# Altium PCB Control Board-v1.0.PcbDoc (part 6 of 8)
Units mil, origin at the board's own origin, x right, y up, seen from the top; angles counter-clockwise.
Board outline 7874.02 x 5118.11 mil, 4 copper layers (Top Layer, Layer 1, Layer 2, Bottom Layer), stack 61.654 mil thick; 475 components, 366 nets, 1579 pads, 587 vias.
Unrouted connection lines stored in the file: 427.
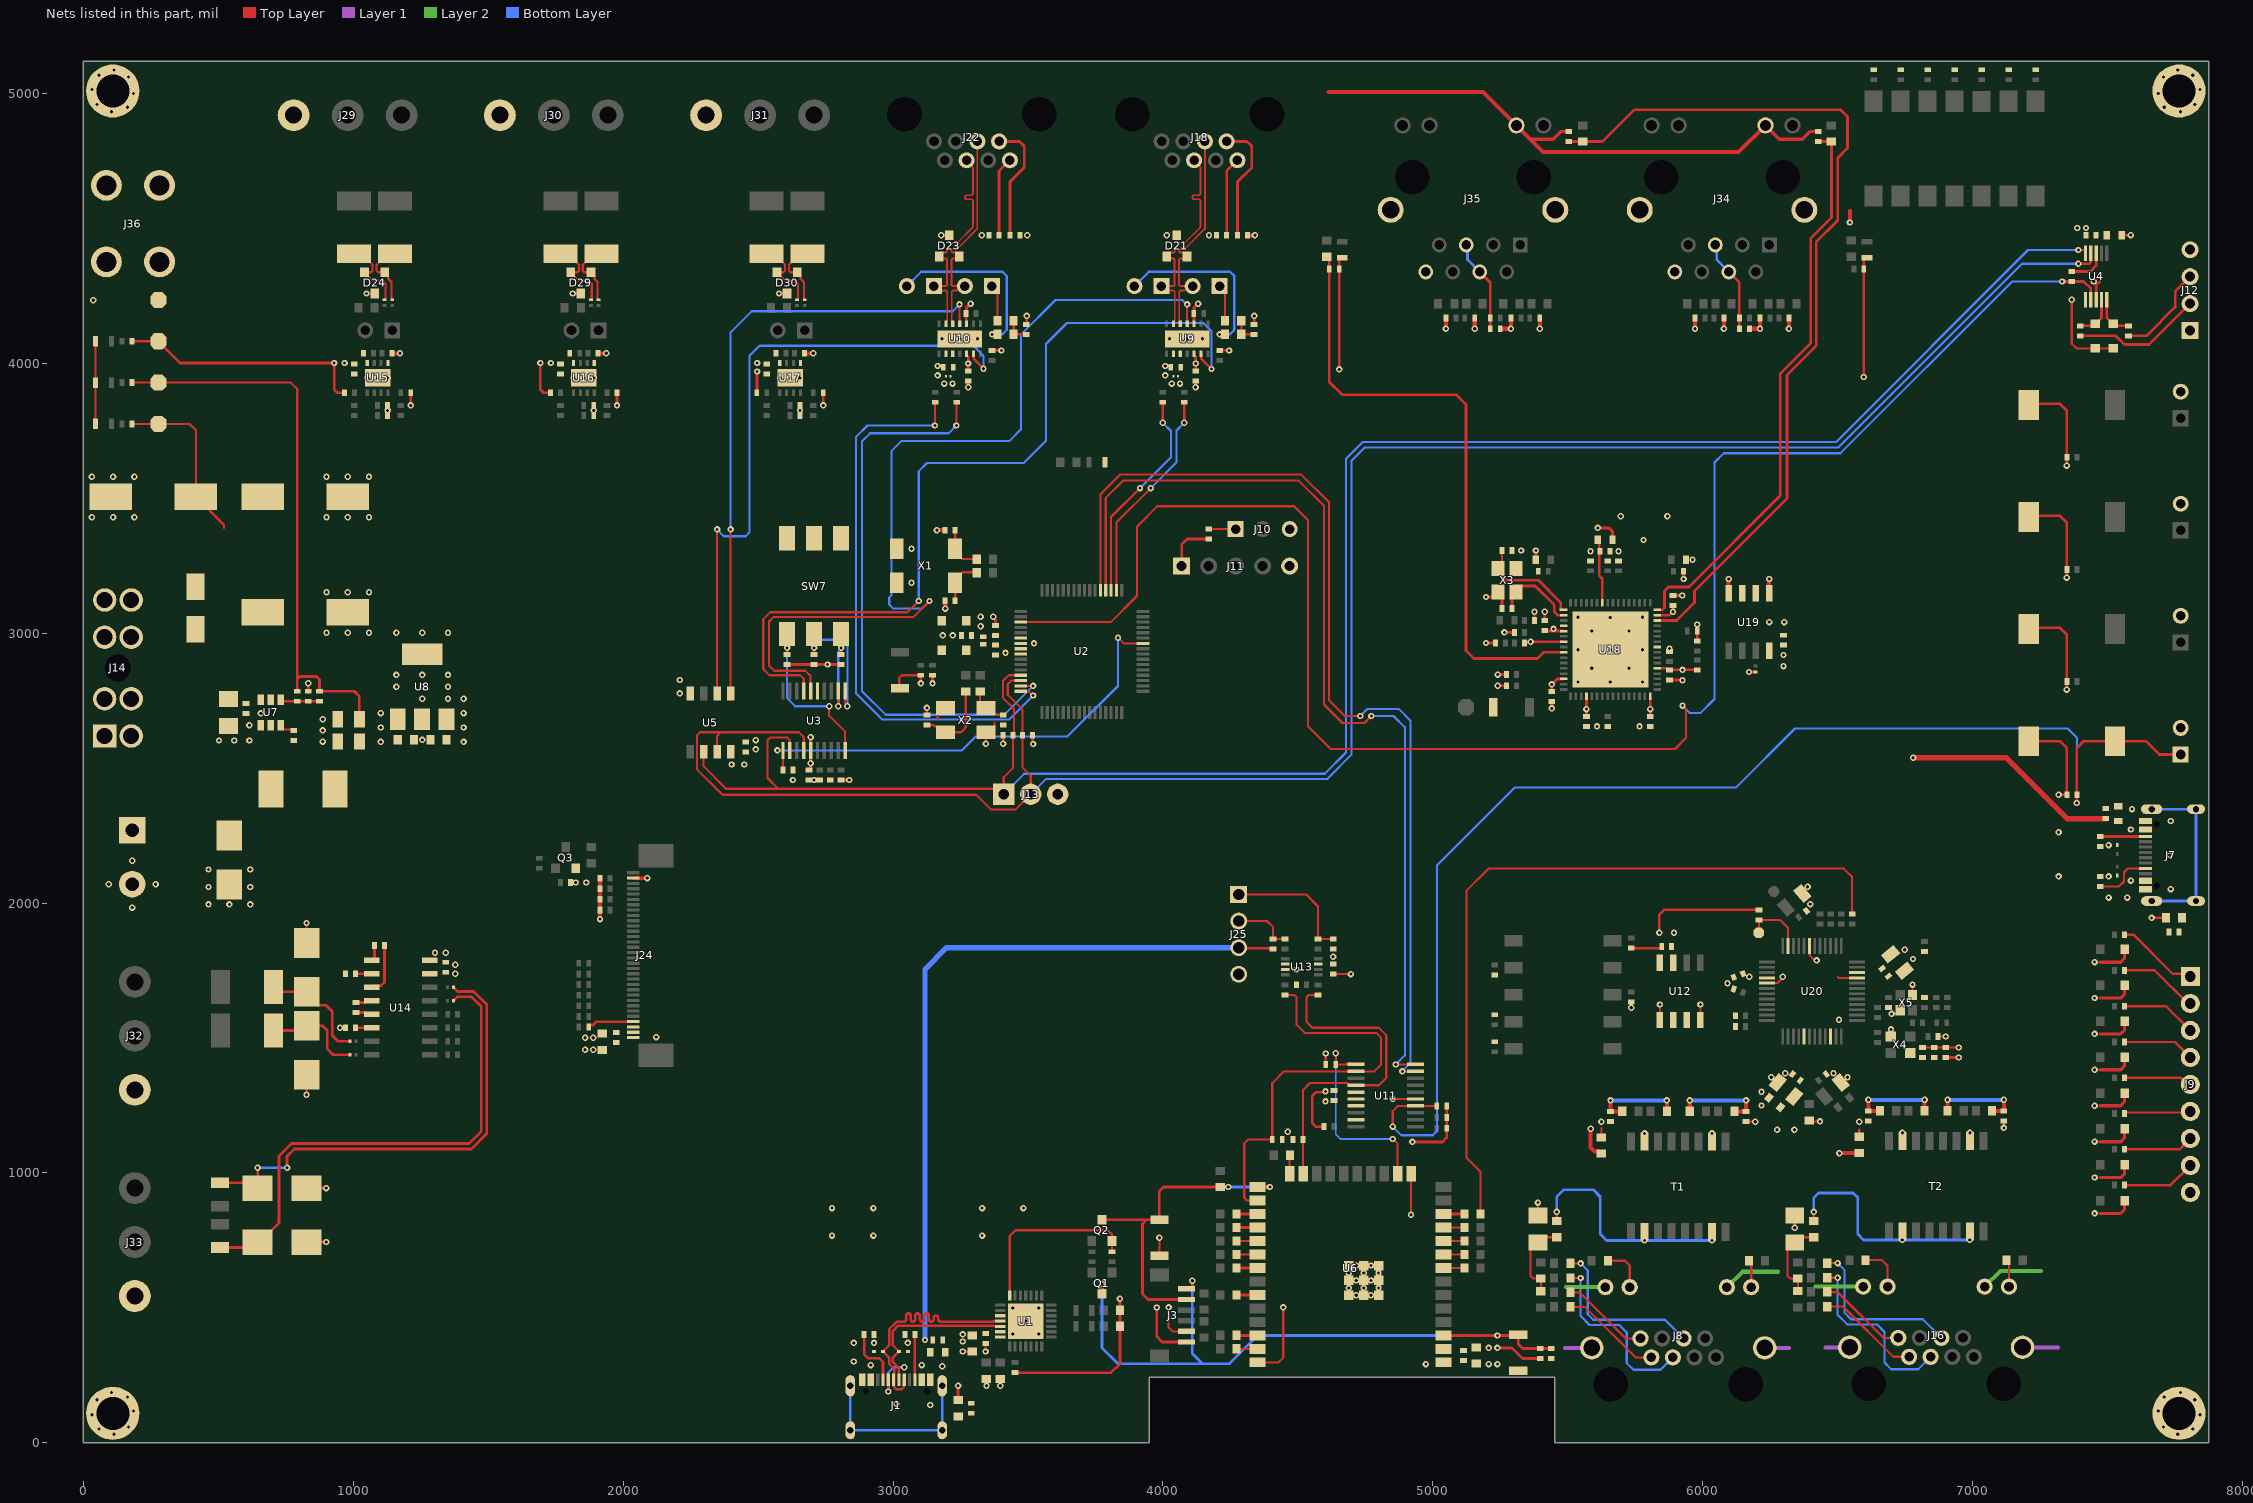
[diagram p5: the nets of this part, all layers, seen from the top]

## Via types
v1: diameter 23.62, hole 11.81, Top Layer to Bottom Layer, 587 vias

## Nets (pads, with @x,y where several pads share a name; then routed paths per layer and width w, separated by ;. In a path a pad name is that pad's centre, name@x,y a point inside that pad or via, vN(x,y) a via of type N, cw(c..) or ccw(c..) an arc to the next point about the centre after c; other vN are vias at no path point) (continued)
+3V3: C2.1 C3.2 C9.2 C10.2 C14.2 C16.2 C22.2 C26.2 C34.2 C37.2 C39.2 C40.2 C41.2 C43.2 C47.2 C48.2 C52.2 C53.2 C54.2 C55.2 C56.2 C57.2 C67.2 C68.1 C80.2 C81.2 C82.2 C96.2 C99.2 C100.2 C101.2 C104.2 D5.1 FB4.1 FB5.2 FB6.1 FB7.1 FB9.1 J3.1 J8.9 J8.11 J11.1 J12.1 J16.9 J16.11 J24.2 J24.3 J24.31 L1.1 LED4.1 LED5.1 R4.2 R5.2 R6.2 R7.2 R8.1 R10.2 R11.2 R20.2 R21.2 R22.2 R25.2 R33.2 R39.2 R40.2 R41.2 R46.1 R73.2 R75.2 R91.2 R92.2 R93.1 R94.1 R95.1 R103.2 R104.2 R105.2 R106.2 R116.1 R122.2 R123.2 R124.2 R125.2 R126.2 R127.2 R128.2 R129.2 R140.1 R141.1 R144.1 R157.1 R158.1 R161.2 R162.2 R165.2 R166.2 R173.2 R176.1 R190.2 R215.2 R216.2 TP3.1 U1.6 U1.7 U2.6 U2.8 U3.5 U5.8 U6.2 U8.3 U9.5 U10.5 U11.5 U12.8 U13.3 U14.16 U15.8 U16.8 U17.8 U18.5 U18.7 U18.14 U18.20 U18.32 U18.37 U18.47 U19.8 U20.22 U20.40 X4.4 | length 7220.8
  Top Layer w10: R46.1@180.31,4081.02 TP3.1@278.31,4081.02 358.68,4000.65 v1(929.32,4000.65) 929.32,3902.91 941.82,3890.41 R103.2@967.2,3890.41 ; R105.2@1127.32,3806.57 v1(1127.32,3825.11) R104.2@1127.32,3843.65 ; v1(1213.32,3843.65) R106.2@1213.32,3890.41 ; v1(1693.32,4000.65) 1693.32,3902.91 1705.82,3890.41 R122.2@1731.2,3890.41 ; R124.2@1891.32,3806.57 v1(1891.32,3825.11) R123.2@1891.32,3843.65 ; v1(1977.32,3843.65) R125.2@1977.32,3890.41 ; v1@2495.7,3968.61 v1(2496.2,3969.11) R126.2@2496.2,3891.41 ; R41.2@2607.41,2883.95 R40.2@2707.41,2883.95 R39.2@2807.41,2883.95 ; R128.2@2655.32,3806.57 v1(2655.32,3825.11) R127.2@2655.32,3843.65 ; v1(2741.32,3843.65) R129.2@2741.32,3890.41 ; v1(3145.96,2813.84) R20.2@3145.96,2843.84 ; U10.5@3272.32,4035.41 3272.32,4029.5 3278.01,4023.81 v1(3278.01,3998.74) 3277.96,3998.68 3277.96,3971.2 C37.2@3277.91,3971.15 ; v1(3407.84,2590.02) 3407.84,2615.43 R21.2@3410.9,2618.49 ; R8.1@3452.12,260.37 3807.88,260.37 3840.49,292.98 R75.2@3840.49,431.69 R73.2@3840.49,490.74 v1(3840.49,534.19) ; R22.2@3517.09,2621.56 3517.99,2620.65 3517.99,2590.24 v1(3518.9,2589.33) ; v1(3977,501.85) 3977,393.56 3996.67,373.9 J3.1@4086.23,373.9 ; J11.1@4069.27,3248.42 4069.27,3327.74 4089.96,3348.42 R25.2@4169.27,3348.42 ; U9.5@4115.39,4035.41 4115.39,4029.5 4121.09,4023.81 v1(4121.09,3998.74) 4121.04,3998.68 4121.04,3971.2 C34.2@4120.98,3971.15 ; R5.2@4597,1171.74 4565.47,1171.74 4553.1,1184.1 4553.1,1286.19 4565.8,1298.89 4598.84,1298.89 v1(4602.04,1302.08) ; R176.1@4603,1402 v1(4603,1442.7) ; v1(4653,3977.11) 4652.82,3977.29 R166.2@4652.82,4348.65 4652.82,4385.8 4657.66,4390.65 LED5.1@4664.63,4390.65 ; v1(4924,1115) 5035.23,1115 5051,1130.77 R6.2@5051,1165.44 R7.2@5051,1205.77 R173.2@5051,1248.51 ; v1@5239,346.18 v1(5239,351.9) 5292.67,351.9 5332.1,312.47 R4.2@5397.23,312.47 ; v1(5240.01,2846.33) R144.1@5272.3,2846.33 ; R158.1@5339.3,2963.21 5341.61,2965.52 5359.49,2965.52 v1(5361.8,2967.83) ; v1@5362.1,2968.13 U18.7@5484.05,2968.13 ; C54.2@5414.3,3009.87 5416.59,3007.58 U18.5@5483.97,3007.58 ; C57.2@5440.47,2783.33 v1(5440.47,2810.13) 5460.67,2830.33 U18.14@5484.05,2830.33 ; v1@5446.53,3007.58 U18.5@5483.97,3007.58 ; U18.5@5484.05,3007.5 U18.5@5483.97,3007.58 ; C52.2@5568.91,2691.69 U18.20@5568.91,2765.59 ; v1(5735,1612) R216.2@5735,1633 ; R215.2@5735,1833 5843.54,1833 5847.54,1837 C104.2@5847.54,1839 ; C53.2@5805.13,2691.69 U18.32@5805.13,2765.59 ; U18.37@5830.5,2869.7 5866.8,2869.7 5872.8,2863.7 C56.2@5876.3,2863.7 5876.43,2863.83 5979.17,2863.83 R161.2@5979.3,2863.97 ; U18.47@5830.5,3066.55 5876.51,3066.55 5889.31,3079.35 v1(5889.66,3079.35) 5889.73,3079.42 5889.73,3102.26 C55.2@5889.8,3102.33 ; v1(5839,1890) 5839,1957.01 5856.7,1974.71 R190.2@6207.65,1974.71 ; R162.2@5979.3,2970.5 R157.1@5979.3,3007.5 v1(5979.3,3032.1) ; v1(6596.33,3948.98) R165.2@6596.33,4348.86 6596.33,4385.8 6601.17,4390.65 LED4.1@6608.15,4390.65 ; C101.2@6900.24,1428 v1(6948,1428) ; FB5.2@7551.59,4474.4 v1(7585.6,4474.4)
  Top Layer w12: J24.31@2037.47,2092.24 v1(2089.01,2092.24) ; R126.2@2495.2,3890.41 R126.2@2496.2,3891.41 ; C14.2@2688.56,2492.68 2691.56,2492.68 2694.56,2495.68 v1(2694.56,2517.9) U3.5@2694.56,2564.7 v1@2694.56,2620.11 ; FB7.1@5381.44,3271.75 v1(5381.47,3306.22) ; v1(5610.37,3389.83) 5650.9,3389.83 5665.49,3375.24 FB9.1@5665.49,3346.83
  Top Layer w15: R116.1@1143.36,4036.74 v1(1173.13,4036.74) ; R140.1@1907.36,4036.74 v1(1937.13,4036.74) ; v1(1914.47,1940.66) R93.1@1914.47,2013.87 R94.1@1914.47,2052.87 R95.1@1914.47,2091.87 ; R141.1@2671.36,4036.74 v1@2701.13,4036.74
  Layer 2 w15: 5493.8,576.8 J8.9@5639,576.8 ; J8.11@6089,576.8 6146.2,634 6278,634 ; 6416.84,578.84 J16.9@6594.08,578.84 ; J16.11@7044.08,578.84 7102.24,637 7252,637
  other v1: 5207,351.9 3258.34,375.58 3258.34,401.89 4461.9,1153.07 6217.14,1250 6217.14,1300.82 1859,1501.11 1888.97,1500.89 6171.68,1726.99 4494.5,1753.94 1303,1816.11 1343,1816.11 6747.75,1826.65 2629.05,2455.68 2402,2513.11 2449,2513.11 1409,2597.11 2694.56,2614.11 1409,2650.44 1409,2703.78 5568.69,2718.34 5804.91,2718.34 1351,2757.11 1409,2757.11 5924.8,2863.83 6298.8,2877.83 2757.41,2883.95 6298.8,2918.83 3522.27,2961.95 5446.53,3015.56 3324.27,3025.68 3324.27,3060.37 5961.49,3271.72 968.2,4000.65 1732.2,4000.65 2496.2,4000.65 2704.32,4036.74
+3V3-A: C76.2 C78.2 C79.2 C97.2 FB4.2 T1.2 T1.7 T2.2 T2.7 U20.5 | length 192
  Top Layer w15: v1(5584.52,1163.94) 5584.52,1094.54 5599.56,1079.5 5616.61,1079.5 C76.2@5624.11,1072 ; v1(6506,1073) 6506.52,1073.52 6578.75,1073.52 C97.2@6579.27,1074.04
  other v1: 5784.08,1146.7 6034.08,1146.7 6739.16,1148.74 6989.16,1148.74 6275,1160 6339,1160
+5V: C18.2 C25.2 C27.2 C31.2 C32.2 C33.1 C36.1 D20.1 D22.1 J25.3 L2.2 R9.2 R12.2 R42.2 R45.1 R47.1 R55.1 R63.2 R64.2 R72.1 TP2.1 U8.1 U9.3 U9.10 U10.3 U10.10 U13.7 | length 5814.5
  Top Layer w8: R45.1@180.31,3928.02 TP2.1@278.31,3928.02 769.1,3928.02 792.56,3904.55 792.56,2828.58
  Top Layer w10: C18.2@792.56,2784.72 792.56,2828.58 803.45,2839.48 863.42,2839.48 874.8,2828.1 R42.2@874.8,2784.65 1003.81,2784.65 1022.8,2765.65 C25.2@1022.8,2681.15 ; R55.1@3270.82,4183.65 3271.57,4182.9 3271.57,4146.4 U10.10@3272.32,4145.65 ; v1(3345.99,211.46) R72.1@3345.99,237.37 ; R47.1@4113.89,4183.65 4114.64,4182.9 4114.64,4146.4 U9.10@4115.39,4145.65 ; J25.3@4280.41,1834.77 4283.18,1831.99 4405.87,1831.99 R63.2@4408,1829.86
  Top Layer w12: R55.1@3271.72,4183.65 3271.72,4205.05 v1(3287.2,4220.53) ; R47.1@4114.79,4183.65 4114.79,4205.05 v1(4130.27,4220.53)
  Top Layer w20: v1(6779,2538) 7124.59,2538 7349.78,2312.81 R12.2@7495.25,2312.81
  Bottom Layer w20: v1(3118.14,381.4) 3118.14,453.23 3118.14,1754.41 3198.49,1834.77 J25.3@4280.41,1834.77
  other v1: 4630.36,1801.29 1102.1,2597.11 1102.1,2650.44 1102.1,2703.78 3189.64,3924.51 3220.14,3924.51 4032.72,3924.51 4063.21,3924.51
+24V: C19.1 C20.1 C21.1 C23.2 C24.2 D17.1 R44.1 TP1.1 U7.2 U7.3 | length 692.5
  Top Layer w8: R44.1@180.31,3775.02 TP1.1@278.31,3775.02 393.55,3775.02 417.37,3751.19 417.37,3504.9 521.5,3400.77 521.5,3388.99 ; C19.1@389,3533.38 C19.1@417.48,3504.9
ADC-CH1: D15.1 R37.1 U4.4 | length 157.7
  Top Layer w10: R37.1@7398.04,4138.4 7446.1,4138.4 D15.1@7453.1,4145.4 ; D15.1@7454.08,4144.42 7476.78,4167.12 U4.4@7476.78,4234.72
ADC-CH2: D16.1 R38.1 U4.5 | length 159.5
  Top Layer w10: U4.5@7496.47,4234.72 7496.47,4168.01 7519.07,4145.4 D16.1@7521.04,4145.4 7528.04,4138.4 R38.1@7577.04,4138.4
ADC-RDY: R32.2 U2.3 U4.2 | length 6507
  Top Layer w8: U2.3@3472.9,3040.69 3806.67,3040.69 3903.59,3137.61 3903.59,3394.55 3978.9,3469.87 4485.05,3469.87 4537.3,3417.62 4537.3,2655.2 4621.79,2570.7 5896.59,2570.7 5937.85,2611.96 5937.85,2718.34 v1(5924.8,2731.39)
  Top Layer w10: v1(7331,4302.83) 7366.67,4302.83 7366.88,4302.62 R32.2@7367.1,4302.83 7411.02,4302.83 7437.41,4276.44 U4.2@7437.41,4234.72
  Bottom Layer w8: v1(5924.8,2731.39) 5952.64,2703.56 5990.56,2703.56 6043,2756 6043,3632.37 6077.23,3666.59 6509.59,3666.59 7145.83,4302.83 v1(7331,4302.83)
CAN1_N: D21.2 J18.5 J19.2 U9.12 | length 842.1
  Top Layer w6.5: U9.12@4064.21,4145.65 4061.56,4148.3 4061.56,4156.8 4060.34,4158.01 4060.34,4265.34 4064.15,4269.15 4080.01,4269.15 J19.2@4096.51,4285.65 ; J19.2@4109.86,4285.65 J19.2@4096.51,4285.65 ; J18.5@4155.4,4821.64 4155.28,4821.53 4155.28,4497.48 4086.59,4428.79 4069.4,4428.79 4059.57,4418.96 4059.57,4413.57 4063.38,4409.77 4075.83,4409.77 4088.72,4396.87 D21.2@4088.72,4394.91 4082.14,4388.33 4063.38,4388.33 4059.57,4384.52 4059.57,4289.45 4063.38,4285.65 J19.2@4096.51,4285.65
CAN1_P: D21.1 J17.1 J18.4 U9.13 | length 842.1
  Top Layer w6.5: U9.13@4038.62,4145.65 4038.62,4151.55 4043.84,4156.77 4043.84,4265.34 4040.03,4269.15 4010.82,4269.15 J17.1@3994.32,4285.65 4039.26,4285.65 4043.07,4289.45 4043.07,4384.52 4039.26,4388.33 4020.5,4388.33 D21.1@4013.92,4394.91 4013.92,4396.87 4026.81,4409.77 4039.26,4409.77 4043.07,4413.57 4043.07,4425.79 4062.56,4445.29 4079.76,4445.29 4138.78,4504.31 4138.78,4596.98 4138.78,4600.23 ccw(c4131.53,4600.23) 4131.53,4607.48 4115.81,4607.48 cw(c4115.81,4614.73) 4115.81,4621.98 4131.53,4621.98 ccw(c4131.53,4629.23) 4138.78,4629.23 4138.78,4692.59 4138.78,4724.95 4115.24,4748.5 J18.4@4115.24,4751.57
CAN1_RX: R49.2 U2.50 | length 800.6
  Top Layer w8: U2.50@3827.22,3158.79 3827.22,3409.52 v1(3955,3537.3) ; v1(4078.81,3779.11) R49.2@4078.81,3855.15
  Bottom Layer w8: v1(3955,3537.3) 4050.29,3632.59 4050.29,3750.6 v1(4078.81,3779.11)
CAN1_TX: R50.2 U2.51 | length 800.8
  Top Layer w8: U2.51@3807.54,3158.79 3807.54,3430.17 v1(3914.68,3537.3) ; v1(3999.34,3779.11) R50.2@3999.34,3855.15
  Bottom Layer w8: v1(3914.68,3537.3) 4029.48,3652.1 4029.48,3748.97 v1(3999.34,3779.11)
CAN2_N: D23.2 J22.5 J23.2 U10.12 | length 842.1
  Top Layer w6.5: U10.12@3221.21,4145.65 3218.56,4148.3 3218.56,4156.8 3217.34,4158.01 3217.34,4265.34 3221.15,4269.15 3237.01,4269.15 J23.2@3253.51,4285.65 ; J23.2@3266.86,4285.65 J23.2@3253.51,4285.65 ; J22.5@3312.4,4821.64 3312.28,4821.53 3312.28,4497.48 3243.59,4428.79 3226.4,4428.79 3216.57,4418.96 3216.57,4413.57 3220.38,4409.77 3232.83,4409.77 3245.72,4396.87 D23.2@3245.72,4394.91 3239.14,4388.33 3220.38,4388.33 3216.57,4384.52 3216.57,4289.45 3220.38,4285.65 J23.2@3253.51,4285.65
CAN2_P: D23.1 J20.1 J22.4 U10.13 | length 842.1
  Top Layer w6.5: U10.13@3195.62,4145.65 3195.62,4151.55 3200.84,4156.77 3200.84,4265.34 3197.03,4269.15 3167.82,4269.15 J20.1@3151.32,4285.65 3196.26,4285.65 3200.07,4289.45 3200.07,4384.52 3196.26,4388.33 3177.5,4388.33 D23.1@3170.92,4394.91 3170.92,4396.87 3183.81,4409.77 3196.26,4409.77 3200.07,4413.57 3200.07,4425.79 3219.56,4445.29 3236.76,4445.29 3295.78,4504.31 3295.78,4596.98 3295.78,4600.23 ccw(c3288.53,4600.23) 3288.53,4607.48 3272.81,4607.48 cw(c3272.81,4614.73) 3272.81,4621.98 3288.53,4621.98 ccw(c3288.53,4629.23) 3295.78,4629.23 3295.78,4692.59 3295.78,4724.95 3272.24,4748.5 J22.4@3272.24,4751.57
CAN2_RX: R57.2 U2.15 | length 2146.9
  Top Layer w8: v1@3234.47,3769.11 3234.47,3853.88 R57.2@3235.73,3855.15 ; U2.15@3472.9,2804.47 v1(3518.9,2804.47)
  Bottom Layer w8: v1@3234.47,3769.11 3205.98,3740.63 2915.14,3740.63 2884.45,3709.93 2884.45,2785.43 2972.55,2697.33 3411.76,2697.33 v1(3518.9,2804.47)
  other v1: 3234.47,3769.18
CAN2_TX: R58.2 U2.16 | length 2131.5
  Top Layer w8: v1@3155,3769.11 3155,3853.88 R58.2@3156.27,3855.15 ; U2.16@3472.9,2784.78 3473.06,2784.61 3503.23,2784.61 v1(3518.9,2768.95)
  Bottom Layer w8: v1@3155,3769.11 2905.12,3769.11 2863.17,3727.16 2863.17,2776.62 2959.82,2679.96 3429.92,2679.96 v1(3518.9,2768.95)
  other v1: 3155,3769.18
"CHASIS GND": "J34.Shield 1" "J34.Shield 2" "J35.Shield 1" "J35.Shield 2" J8.13 J8.14 J16.13 J16.14 J34.8 J35.8 J36.1 pad.MH1 | length 410.6
  Layer 1 w15: 5490,352 J8.13@5589,352 ; J8.14@6229.16,352 6319,352 ; 6454.04,354.04 J16.13@6544.08,354.04 ; J16.14@7184.24,354.04 7315.96,354.04
  other v1: 114.33,32.27 7759.29,32.27 58.42,51.29 7815.2,51.29 167.31,58.36 7706.3,58.36 32.33,104.27 7841.29,104.27 186.3,118.67 7687.32,118.67 51.35,160.18 7822.27,160.18 164.24,170.25 7709.38,170.26 104.33,186.27 7769.29,186.27 104.33,4931.84 7769.29,4931.84 164.24,4947.86 7709.38,4947.86 51.35,4957.93 7822.27,4957.93 186.3,4999.44 7687.32,4999.44 32.33,5013.84 7841.29,5013.84 167.31,5059.75 7706.31,5059.75 58.42,5066.82 7815.2,5066.82 114.33,5085.84 7759.29,5085.84
CMT1: R187.2 T1.10 T1.15 | length 835
  Top Layer w8: R187.2@5459.04,822 v1(5459.04,856)
  Bottom Layer w10: v1(5459.04,856) 5459.04,912.04 5485,938 5594,938 5620,912 5620,773.14 5643.14,750 v1(5784,750) v1(6034,750)
CMT2: R204.2 T2.10 T2.15 | length 822.9
  Top Layer w8: R204.2@6411,822 v1(6411,856)
  Bottom Layer w10: v1(6411,856) 6411,908.51 6428.14,925.66 6556.66,925.66 6574,908.31 6574,773 6594.96,752.04 v1(6739.08,752.04) v1(6989.08,752.04)
CRS_DV: R86.1 R207.2 | length 2832.6
  Top Layer w8: R86.1@5176.54,848 5176.54,1004.77 5123.89,1057.43 5123.89,2045.58 5205.72,2127.42 6522.17,2127.42 6553.04,2096.55 R207.2@6553.04,1959.18
DTR: Q2.2 R76.1 U1.28 | length 678.2
  Top Layer w9: U1.28@3432.43,545.86 3432.43,766.58 3453.52,787.67 3795.26,787.67 3811,771.93 R76.1@3811,708.3
EMERGENCY: C28.2 J2.1 R173.1 SW2.1 U11.14 | length 4855.9
  Top Layer w8: v1(4851.36,1171.74) 4851.36,1229.21 4870.66,1248.51 U11.14@4935.47,1248.51 R173.1@5018,1248.51
  Top Layer w10: v1(7385.5,2370.68) C28.2@7385.5,2401.11 7385.5,2573.91 7411.22,2599.62 SW2.1@7526.45,2599.62 7641.79,2599.62 7691,2550.41 J2.1@7770.22,2550.41
  Bottom Layer w8: v1(4851.36,1171.74) 4883.26,1139.84 4999.68,1139.84 5015.09,1155.25 5015.09,2140.09 5302.5,2427.5 6122.37,2427.5 6341.43,2646.55 7352.35,2646.55 7385.5,2613.4 v1(7385.5,2370.68)
EN: C5.2 J3.6 Q1.3 R4.1 SW1.2 U6.3 | length 2611.4
  Top Layer w10: Q1.3@3774,552.3 v1(3774,589) ; J3.6@4086.23,570.75 4103.72,570.75 4108.57,575.59 v1(4108.57,600.95) ; U6.3@5044.5,397.9 v1(5239,397.9) 5316.23,397.9 5316.23,365.75 5332.51,349.47 R4.1@5397.23,349.47 C5.2@5438,349.47
  Bottom Layer w10: v1(3774,589) 3774,351.71 3832.35,293.36 4145.53,293.36 ; v1(4108.57,600.95) 4108.57,330.33 4145.53,293.36 ; v1(5239,397.9) 4350.72,397.9 4246.19,293.36 4145.53,293.36
EN_CAN: U3.17 U9.6 | length 3227.1
  Top Layer w8: U3.17@2668.97,2785.18 2668.97,2830.92 2655.69,2844.19 2541.69,2844.19 2518.82,2867.06 2518.82,3051.4 2544.83,3077.4 3053.29,3077.4 v1(3095,3119.11)
  Top Layer w9: U9.6@4140.98,4035.41 4141.31,4035.08 4141.31,4016.93 v1(4179.59,3978.65)
  Bottom Layer w8: v1(3095,3119.11) 3095,3599.37 3125.81,3630.18 3483.83,3630.18 3566.68,3713.03 3566.68,4071.14 3644.53,4148.99 4149.31,4148.99 4179.59,4118.71 v1(4179.59,3978.65)
EN_CAN_2: U5.2 U10.6 | length 2416.4
  Top Layer w8: U5.2@2348.08,2776.72 v1(2348.08,3384.11)
  Top Layer w9: U10.6@3297.91,4035.41 3298.23,4035.08 3298.23,4016.93 v1@3336.52,3978.65
  Bottom Layer w8: v1(2348.08,3384.11) 2373.08,3359.11 2454.13,3359.11 2468.27,3373.24 2468.27,4027.51 2505.21,4064.46 3297.87,4064.46 3335,4027.32 v1(3335,3979.11)
ERRLED: R164.2 R166.1 U18.9 | length 2303.9
  Top Layer w10: R164.2@4606.32,4394.17 4615.82,4384.67 R166.1@4615.82,4348.65 4615.82,3931.2 4664.37,3882.65 5087.8,3882.65 5122.8,3847.64 5122.8,2934.82 5151.54,2906.09 5386.87,2906.09 5409.54,2928.76 U18.9@5484.05,2928.76
ESP-IO6: U2.53 U11.19 | length 3723.3
  Top Layer w8: U2.53@3768.17,3158.79 3768.17,3514.26 3841.01,3587.09 4512.45,3587.09 4615.16,3484.38 4615.16,2751.2 4673.6,2692.76 v1(4730.95,2692.76) ; v1(4886.79,1376.46) U11.19@4935.47,1376.46
  Bottom Layer w8: v1(4730.95,2692.76) 4757.51,2719.32 4873.12,2719.32 4916.46,2675.99 4916.46,1406.13 v1(4886.79,1376.46)
ESP-IO7: U2.52 U11.20 | length 3644.4
  Top Layer w8: U2.52@3787.85,3158.79 3787.85,3500.94 3852.01,3565.09 4503.34,3565.09 4596.69,3471.74 4596.69,2735.71 4665.18,2667.23 4746.46,2667.23 v1(4772,2692.76) ; v1(4862,1402) U11.20@4935.44,1402.03
  Bottom Layer w8: v1(4772,2692.76) 4854.24,2692.76 4896,2651 4896,1436 v1(4862,1402)
ESP-SCL: R10.1 R98.2 U6.26 U11.2 | length 1584.8
  Top Layer w8: U6.26@4349.78,898 4311.47,898 4301.04,908.43 4301.04,1109.67 4315.5,1124.13 R10.1@4405,1124.13 4405,1333 4448.46,1376.46 U11.2@4715,1376.46 4782.46,1376.46 4808,1402 4808,1501 4790,1519 4524.84,1519 4494.96,1548.88 4494.96,1650.86 4485.96,1659.86 R98.2@4452.43,1659.86
ESP-SDA: R11.1 R96.2 U6.23 U11.4 | length 1254.4
  Top Layer w8: U6.23@4519.07,997.21 4519.07,1084.13 4519.07,1307.56 4544.73,1333.22 4681.86,1333.22 4687.5,1327.58 4689.8,1325.28 U11.4@4715,1325.28 4800.49,1325.28 4827,1351.79 4827,1510.32 4799.03,1538.28 4553.8,1538.28 4531.96,1560.13 4531.96,1650.86 4540.96,1659.86 R96.2@4574.48,1659.86
ESP_SCL#: J25.2 R63.1 R100.1 | length 225.2
  Top Layer w8: J25.2@4280.41,1933.2 4385.5,1933.2 4408,1910.7 R63.1@4408,1866.86 R100.1@4452.43,1866.86
ESP_SDA#: J25.1 R64.1 R99.1 | length 489.1
  Top Layer w8: J25.1@4280.41,2031.62 4530.38,2031.62 4574.48,1987.52 R99.1@4574.48,1866.86 4574.57,1866.95 4630.36,1866.95 R64.1@4630.46,1867.05
ESPUSB_N: D1.1 J1.A7 J1.B7 U1.5 | length 792.3
  Top Layer w9: v1@2982.31,195.76 J1.B7@2982.31,233.9 ; J1.A7@3021.68,233.9 3020.3,235.28 3020.3,278.12 2999.26,299.16 2999.26,316.26 3019.31,336.31 3019.31,338.08 D1.1@3020.12,338.89 ; D1.1@3021.89,338.89 D1.1@3020.12,338.89 ; U1.5@3397,431.69 3395.59,433.09 3371.58,433.09 3370.14,434.53 3018.67,434.53 2999.26,415.11 2999.26,361.53 3019.31,341.48 3019.31,339.71 D1.1@3020.12,338.89
  Bottom Layer w9: v1(2982.12,190.38) 2982.12,260.71 3001.54,280.12 v1(3041.37,280.12)
ESPUSB_P: D2.1 J1.A6 J1.B6 U1.4 | length 912
  Top Layer w9: D2.1@2962.63,338.89 D2.1@2964.4,338.89 ; J1.B6@3041.37,233.9 3039.96,232.5 3039.96,206.39 3032.35,198.78 3011.01,198.78 3004.28,205.52 3004.28,233.9 3004.28,274.34 2985.26,293.36 2985.26,316.26 2965.21,336.31 2965.21,338.08 D2.1@2964.4,338.89 ; U1.4@3397,451.37 3395.59,449.96 3371.58,449.96 3370.14,448.53 3212.74,448.53 3176.24,448.53 cw(c3176.24,457.53) 3167.24,457.53 3167.24,463.2 ccw(c3158.74,463.2) 3150.24,463.2 3150.24,457.03 cw(c3141.74,457.03) 3133.24,457.03 3133.24,471.37 ccw(c3124.74,471.37) 3116.24,471.37 3116.24,457.03 cw(c3107.74,457.03) 3099.24,457.03 3099.24,471.37 ccw(c3090.74,471.37) 3082.24,471.37 3082.24,457.03 cw(c3073.74,457.03) 3065.24,457.03 3065.24,471.37 ccw(c3056.74,471.37) 3048.24,471.37 3048.24,457.53 cw(c3039.24,457.53) 3039.24,448.53 3034.74,448.53 3012.87,448.53 2985.26,420.91 2985.26,361.53 2965.21,341.48 2965.21,339.71 D2.1@2964.4,338.89
EXP_INT: R176.2 U6.16 U11.1 | length 801.9
  Top Layer w7: R176.2@4640,1402 R176.2@4640.06,1402.06 ; v1(4640.06,1443.66) R176.2@4640.06,1402.06 ; 4678.86,1404.85 4705,1404.85 U11.1@4707.8,1402.06 ; U11.1@4715,1402.06 U11.1@4707.8,1402.06 ; v1(4851.36,1126) 4869.07,1108.28 U6.16@4869.07,997.21 ; R176.2@4640.06,1402.06 4678.86,1402.06 4705,1402.06 U11.1@4707.8,1402.06
  Bottom Layer w7: v1(4640.06,1443.66) 4640.06,1142.94 4657,1126 v1(4851.36,1126)
GND: C1.1 C2.2 C3.1 C4.1 C5.1 C6.2 C7.1 C8.1 C9.1 C10.1 C11.1 C12.1 C13.1 C14.1 C15.2 C16.1 C19.2 C20.2 C21.2 C22.1 C23.1 C24.1 C25.1 C26.1 C27.1 C28.1 C29.1 C30.1 C31.1 C32.1 C33.2 C34.1 C35.2 C36.2 C37.1 C38.2 C39.1 C40.1 C41.1 C43.1 C44.1 C45.1 C47.1 C48.1 C49.1 C50.1 C51.1 C52.1 C53.1 C54.1 C55.1 C56.1 C57.1 C58.1 C59.1 C60.1 C61.1 C62.1 C63.1 C64.1 C65.1 C66.1 C67.1 C68.2 C69.1 C70.1 C71.1 C72.1 C73.1 C74.1 C75.1 C76.1 C77.1 C78.1 C79.1 C80.1 C81.1 C82.1 C83.1 C84.1 C85.1 C86.1 C87.1 C88.1 C89.1 C90.1 C91.1 C92.1 C93.1 C94.1 C95.1 C96.1 C97.1 C98.1 C99.1 C100.1 C101.1 C102.1 C103.1 C104.1 D1.2 D2.2 D3.2 D4.2 D5.2 D6.2 D7.2 D8.2 D9.2 D10.2 D11.2 D12.2 D13.2 D14.2 D15.2 D16.2 D19.1 D20.2 D21.3 D22.2 D23.3 D24.3 D25.1 D26.1 D27.1 D28.1 D29.3 D30.3 J1.A1/B12 J1.B1/A12 J2.2 J3.2 J4.2 J5.2 J6.2 J7.A1/B12 J7.B1/A12 J9.9 J10.3 J11.5 J12.4 J13.3 J15.2 J24.1 J25.4 J29.3 J30.3 J31.3 J32.3 J33.3 J34.10 J35.10 LED1.2 LED2.2 LED3.2 LED6.2 Q3.2 R1.2 R2.2 R3.2 R15.2 R16.2 R17.2 R34.2 R35.2 R36.2 R43.1 R51.1 R52.1 R53.1 R59.1 R60.1 R62.1 R74.1 R102.2 R107.2 R130.2 R131.2 R156.1 R159.1 R167.1 R168.1 R169.2 R191.1 R193.1 R195.2 R208.2 R213.1 R217.1 R218.1 R219.1 R220.1 R221.1 R222.1 R223.1 R224.1 R225.1 R226.1 SW1.1 SW2.2 SW3.2 SW4.2 SW5.2 SW6.1 SW7.4 SW7.5 SW7.6 SW8.1 SW9.1 TP4.1 U1.3 U1.29 U2.9 U3.15 U4.1 U4.3 U5.4 U6.1 U6.15 U6.38 U6.39 U6.39_10 U6.39_11 U6.39_12 U6.39_13 U6.39_14 U6.39_15 U6.39_16 U6.39_17 U6.39_18 U6.39_19 U6.39_20 U6.39_21 U6.40 U6.41 U6.42 U6.43 U6.44 U6.45 U6.46 U6.47 U7.4 U8.2 U8.4 U9.2 U9.15 U10.2 U10.15 U11.6 U11.7 U11.9 U11.15 U12.1 U12.2 U12.3 U12.4 U12.7 U13.2 U14.15 U15.5 U15.9 U16.5 U16.9 U17.5 U17.9 U18.4 U18.41 U18.65 U19.1 U19.2 U19.3 U19.4 U20.10 U20.21 U20.31 U20.41 X1.2 X1.3 X2.2 X2.4 X3.2 X3.4 X4.2 X5.2 X5.4 | length 9261.3
  Top Layer w8: LED1.2@45.31,3775.02 LED2.2@45.31,3928.02 LED3.2@45.31,4081.02 ; v1(827,1290.11) D25.1@827,1364.01 ; D26.1@827,1852.21 v1(827,1926.11) ; R43.1@833.68,2784.65 v1(833.68,2814.15) ; v1(951,1537.99) C45.1@972,1537.99 ; v1(1049.32,4258.28) D24.3@1079.32,4258.28 ; v1(1813.32,4258.28) D29.3@1843.32,4258.28 ; v1(2577.32,4258.28) D30.3@2607.32,4258.28 ; SW6.1@3022.96,2795.41 3022.96,2834.84 3031.96,2843.84 C13.1@3104.96,2843.84 ; C7.1@3125.46,2696.34 v1(3125.46,2723.11) ; v1(3178.32,4473.65) D23.3@3208.32,4473.65 ; v1(3258.34,338.41) C3.1@3293.99,338.41 ; v1(3342.99,338.41) C2.2@3342.99,367.91 ; v1(3344.05,2590.02) 3344.05,2632.35 X2.2@3344.27,2632.56 3354.11,2632.56 3375.7,2654.15 3375.7,2668.34 ; v1(3397,211.46) R74.1@3397,237.37 ; SW9.1@3986.82,693.18 v1(3986.82,760.11) ; v1(4020.68,501.86) 4020.68,428.25 4035.66,413.27 J3.2@4086.23,413.27 ; U6.38@4349.78,298 4427.45,298 4445.39,315.94 v1(4445.39,502.08) ; C27.1@4630.46,1736.7 v1(4696,1736.7) ; v1(4851.36,1274.1) U11.15@4935.47,1274.1 ; v1(4919,845) 4919,997.14 U6.15@4919.07,997.21 ; C77.1@5389,842 v1(5389,890.08) ; C76.1@5624.11,1132 5624.11,1166.89 ; U12.1@5841.04,1566.7 v1(5841.04,1624) ; U12.4@5991.04,1566.7 v1(5991.04,1624.11) ; C74.1@6160.11,1191.05 6160.64,1190.53 6193.47,1190.53 v1(6194,1190) ; U20.41@6237.18,1703.22 6237.62,1703.65 6276.89,1703.65 6296.23,1723 v1(6296.23,1726.99) ; v1@6340.5,793.92 C98.1@6340.5,842 ; R195.2@6394.67,1194.89 6398.56,1191 v1(6434,1191) ; U20.31@6394.67,1841 6395.98,1839.69 6395.98,1806.36 6411.84,1790.5 6418.55,1790.5 v1(6421.54,1787.52) ; 6500.28,1725.81 6503.19,1722.89 U20.21@6571.83,1722.89 ; C97.1@6579.27,1134.04 6579.27,1160 ; X4.2@6695.58,1505.51 6697.24,1507.18 v1@6697.24,1530 ; v1(6699.49,1589.35) 6718.63,1589.35 6731.36,1602.08 X5.4@6731.36,1602.92 ; X5.2@6776.63,1660 v1(6776.63,1697.9) ; C99.1@6813.63,1465 C100.1@6856.94,1465 C101.1@6900.24,1465 v1(6948,1465) ; R213.1@6870.6,1505.51 v1(6900.24,1505.51) ; v1(7115.19,1167.13) C83.1@7115.19,1193.09 ; v1(7366.88,4234.72) 7366.88,4072.25 7384.29,4054.85 D16.2@7521.04,4054.85
  Top Layer w9: R59.1@3366.77,4047.22 v1(3401.32,4047.22) ; C38.2@3495.23,4143.65 v1(3495.23,4175.15) ; R51.1@4209.85,4047.22 v1@4244.39,4047.22 ; C35.2@4338.31,4143.65 v1(4338.31,4175.15) ; C60.1@5376.3,3046.87 v1(5376.3,3079.13) ; C54.1@5414.3,3046.87 v1(5414.3,3079.13)
  Top Layer w10: D28.1@827,744.11 v1(900,744.11) ; D27.1@827,944.02 v1(900,944.02) ; v1(3102.96,2813.84) C13.1@3102.96,2843.84 ; 3166.1,2683.73 3166.1,2703.17 3186.04,2723.11 X2.4@3194.66,2723.11 ; C1.1@3240.84,158.46 v1(3240.84,211.46) ; v1@3277.91,3911.01 C37.1@3277.91,3934.15 ; v1(3370.88,3060.37) 3370.88,3056.68 3379.27,3048.28 C10.1@3379.27,3028.42 ; v1(4120.98,3911.01) C34.1@4120.98,3934.15 ; v1(5196.8,2963.21) R159.1@5231.3,2963.21 ; v1(5196.8,3133.83) 5217.55,3133.83 ; v1(5240.01,2805.33) C59.1@5272.3,2805.33 ; X3.2@5241.28,3152.22 5256.24,3137.26 C90.1@5256.24,3091.63 ; v1(5264.9,3002.58) C61.1@5302.3,3002.58 ; C56.1@5876.3,2826.7 5876.95,2826.06 5924.16,2826.06 v1(5924.8,2825.41) ; C55.1@5889.83,3139.35 v1(5923.66,3139.38) ; v1(5928.66,3200.55) C49.1@5928.66,3228.84 ; v1(6170.8,2856.17) R169.2@6195.8,2856.17 ; SW2.2@7207.55,2599.62 7322.79,2599.62 7348.5,2573.91 C28.1@7348.5,2401.11 v1(7318.07,2401.11) ; SW3.2@7207.55,3019.62 7322.79,3019.62 7348.5,2993.91 C29.1@7348.5,2821.11 7348.25,2820.86 7348.25,2790.94 v1(7348,2790.68) ; SW4.2@7207.55,3434.62 7322.79,3434.62 7348.5,3408.91 C30.1@7348.5,3236.11 v1(7348.5,3205.68) ; SW5.2@7207.55,3849.62 7322.79,3849.62 7348.5,3823.91 C58.1@7348.5,3651.11 v1(7348.5,3620.68) ; U4.3@7457.1,4234.72 7457.1,4289.05 7470.88,4302.83 ; v1(7662.54,1945.11) C8.1@7715.54,1945.11
  Top Layer w12: 5361.01,4829.24 5445.05,4829.24 5473.91,4858.1 R168.1@5503.32,4858.1 ; J34.10@6231.97,4881.1 6283.83,4829.24 6367.88,4829.24 6396.74,4858.1 R167.1@6426.15,4858.1 ; 7472.23,850.1 7547.72,850.1 7562.18,864.56 D7.2@7562.18,897.09 ; 7472.23,983.1 7547.72,983.1 7562.18,997.56 D8.2@7562.18,1030.09 ; 7472.23,1116.1 7547.72,1116.1 7562.18,1130.56 D9.2@7562.18,1163.09 ; 7472.23,1249.1 7547.72,1249.1 7562.18,1263.56 D10.2@7562.18,1296.09 ; 7472.23,1382.1 7547.72,1382.1 7562.18,1396.56 D11.2@7562.18,1429.09 ; 7472.23,1515.1 7547.72,1515.1 7562.18,1529.56 D12.2@7562.18,1562.09 ; 7472.23,1648.1 7547.72,1648.1 7562.18,1662.56 D13.2@7562.18,1695.09 ; 7472.23,1781.1 7547.72,1781.1 7562.18,1795.56 D14.2@7562.18,1828.09
  Top Layer w15: C14.1@2688.56,2455.68 R34.2@2715.94,2455.68 ; R36.2@2807.22,2455.68 v1(2838,2455.68) ; v1(3162.27,3381.42) C4.1@3193.27,3381.42 ; v1(3193.27,3090.68) C6.2@3193.27,3120.42 ; R52.1@4312.87,4473.65 v1(4340.32,4473.65) ; 4614,5005.11 5185.14,5005.11 J35.10@5309.15,4881.1 5361.01,4829.24 5408.6,4781.65 6132.52,4781.65 J34.10@6231.97,4881.1 ; v1(5047.99,4127.65) C91.1@5047.99,4167.65 ; v1(5155.02,4127.65) C92.1@5155.02,4167.65 ; C95.1@5249.49,4127.65 v1(5288.99,4127.65) C93.1@5288.99,4167.65 ; v1(5395.99,4127.65) C94.1@5395.99,4167.65 ; v1(5440.47,2721.12) C57.1@5440.47,2746.33 ; v1(5970.82,4127.65) C65.1@5970.82,4167.65 ; v1(6077.84,4127.65) C66.1@6077.84,4167.65 ; U19.4@6095.8,3147.13 v1(6095.8,3200.55) ; C87.1@6172.32,4127.65 v1(6211.82,4127.65) C85.1@6211.82,4167.65 ; U19.1@6245.8,3147.13 v1(6245.8,3200.55) ; v1(6318.82,4127.65) C86.1@6318.82,4167.65 ; v1(6544.7,4521) 6544.7,4563.5
  other v1: 3137.82,140.4 3182.11,284.21 4974,291.9 5207,291.9 5239,291.9 2854.09,301.71 2854.09,370.64 2929.16,370.64 3054.36,370.64 3443.48,403.08 3539.49,403.08 3491.49,451.37 3443.48,499.66 3539.49,499.66 2774,768 2927,768 3330,768 6340.5,796.92 7451.23,850.1 2774,870 2927,870 3330,870 3483,870 7451.23,983.1 7451.23,1116.1 5624.11,1190 6579.27,1190 7451.23,1249.1 4602.04,1265.08 6253.23,1354.35 6535.76,1354.35 6305.12,1369.21 6483.87,1369.21 7451.23,1382.1 1859,1456.31 1888.97,1456.31 2122.47,1503.23 7451.23,1515.1 6697.24,1532 6504.36,1567.85 7451.23,1648.1 6091.44,1703.22 1378,1737.99 1378,1771.61 7451.23,1781.1 6778.38,1792.9 5893.07,1890 181.23,1983.13 464,1995.14 541.23,1995.14 618.46,1995.14 6398.11,1996.12 7503.36,2020.02 7572.29,2020.02 7733.6,2051.79 464,2059.65 618.46,2059.65 6387.99,2060.11 94.46,2069.9 268,2069.9 1824.47,2076.2 1863.57,2076.2 7318.07,2098.64 7503.36,2098.64 464,2124.16 618.46,2124.16 181.23,2156.67 7503.36,2214.78 7318.07,2261.96 7733.6,2303.76 7589.79,2348.05 2707.55,2455.68 2491.29,2569.18 887.3,2598.15 502.8,2602.07 559.05,2602.07 615.3,2602.07 1255.55,2604.3 2491.29,2603.62 887.3,2639.65 5608.06,2654.47 5765.54,2654.47 615.3,2658.9 886.99,2681.15 657.4,2702.65 1255.55,2757.11 2210,2776.72 1160.1,2801.23 1255.55,2801.23 1351,2801.23 5537.75,2818.37 5776.8,2818.37 5657.27,2819.07 2210,2826.11 1160.1,2845.34 1255.55,2845.34 1351,2845.34 5588.38,2869.7 5726.17,2869.7 3416.61,2926.87 5537.75,2938.6 5657.27,2938.6 5776.8,2938.6 5876.38,2943.03 3184.27,2991.42 3221.27,2991.42 900.97,3001.11 979.71,3001.11 1058.45,3001.11 1160.1,3001.11 1255.55,3001.11 1351,3001.11 5588.38,3007.5 5726.17,3007.5 6245.8,3040.83 6301.8,3040.83 5657.27,3058.13 5537.75,3058.83 5776.8,3058.83 900.97,3151.11 979.71,3151.11 1058.45,3151.11 3068.16,3186.56 5583.61,3303.46 5687.49,3303.46 5326.83,3306.22 3068.16,3312.54 5780.19,3344.85 31.78,3429.11 110.52,3429.11 189.26,3429.11 900.97,3429.11 979.71,3429.11 1058.45,3429.11 5695.74,3432.65 5868.55,3432.65 31.78,3579.11 110.52,3579.11 189.26,3579.11 900.97,3579.11 979.71,3579.11 1058.45,3579.11 3278.32,3911.01 1053.72,3945.53 1090.52,3945.53 1127.32,3945.53 1817.72,3945.53 1854.52,3945.53 1891.32,3945.53 2581.72,3945.53 2618.52,3945.53 2655.32,3945.53 3165.01,3954.65 4008.08,3954.65 3165.01,3989.78 4008.08,3989.78 4244.85,4047.22 3180.85,4090.53 3246.73,4090.53 3312.61,4090.53 4023.83,4090.53 4089.8,4090.53 4146.19,4090.53 37,4233 7447.88,4302.83 3328.26,4473.65 3497.32,4473.65 4013.92,4473.65 4170.32,4473.65 7387.15,4500.77 7419.44,4500.77
I2C3_SCL: J13.1 R21.1 U2.13 U3.2 U4.10 U5.6 | length 7550.2
  Top Layer w8: U5.6@2298.08,2560.18 2298.08,2506.34 2380.79,2423.62 2574.54,2423.62 ; U3.2@2617.79,2564.7 2617.66,2564.83 2617.66,2603.35 2607.48,2613.53 2545.9,2613.53 2535,2602.63 2535,2463.16 2574.54,2423.62 ; R21.1@3444.84,2621.56 3444.84,2501.04 3410,2466.2 J13.1@3410,2403.11 3389.49,2423.62 2574.54,2423.62 ; R21.1@3447.9,2621.56 3447.9,2719.6 3406.68,2760.82 3406.68,2822.46 3428.05,2843.84 U2.13@3472.9,2843.84 ; v1@7391.6,4419.4 7415.82,4419.4 7417.73,4417.5 U4.10@7417.73,4407.95
  Bottom Layer w8: J13.1@3410,2403.11 3486,2479.11 4599.11,2479.11 4677.94,2557.94 4677.94,3646.22 4739.31,3707.59 6492.98,3707.59 7204.79,4419.4 v1(7391.15,4419.4)
I2C3_SDA: J13.2 R22.1 U2.14 U3.4 U4.9 U5.7 | length 7894.8
  Top Layer w8: U5.7@2348.08,2560.18 2348.08,2618.95 2361.86,2632.73 ; U3.4@2668.97,2564.7 2668.97,2614.92 2651.15,2632.73 2361.86,2632.73 ; U2.14@3472.9,2824.15 3437.64,2824.15 3424.9,2811.41 3424.9,2771.52 3480.09,2716.33 R22.1@3480.09,2621.56 3480.09,2501.79 3510,2471.87 J13.2@3510,2403.11 3453.96,2347.07 3361.85,2347.07 3307.75,2401.18 2368.32,2401.18 2273.3,2496.2 2273.3,2620.43 2285.6,2632.73 2361.86,2632.73 ; v1(7391.15,4368.4) 7432.17,4368.4 7436.85,4373.09 7436.85,4407.38 U4.9@7437.41,4407.95
  Bottom Layer w8: J13.2@3510,2403.11 3566,2459.11 4607.4,2459.11 4697.94,2549.66 4697.94,3637.94 4747.59,3687.59 6501.27,3687.59 7182.08,4368.4 v1(7391.15,4368.4)
ID0: R41.1 SW7.1 U3.10 | length 619.4
  Top Layer w8: R41.1@2607.41,2920.95 v1(2607.41,2945.41) SW7.1@2607.41,2996.78 ; v1(2763.3,2729.11) 2763.3,2693.44 2822.51,2634.23 U3.10@2822.51,2564.7
  Bottom Layer w8: v1(2607.41,2945.41) 2607.41,2759.11 2637.41,2729.11 v1(2763.3,2729.11)
ID1: R40.1 SW7.2 U3.11 | length 509.1
  Top Layer w8: R40.1@2707.41,2920.95 v1(2707.41,2945.41) SW7.2@2707.41,2996.78 ; U3.11@2822.51,2785.18 2822.51,2741.37 2830.54,2733.34 v1(2830.54,2729.11)
  Bottom Layer w8: v1(2707.41,2945.41) 2737.26,2975.25 2816.38,2975.25 2831.22,2960.41 2831.22,2729.79 v1(2830.54,2729.11)
ID2: R39.1 SW7.3 U3.12 | length 352.5
  Top Layer w8: v1(2796.92,2729.11) U3.12@2796.92,2785.18 ; R39.1@2807.41,2920.95 v1(2807.41,2945.41) SW7.3@2807.41,2996.78
  Bottom Layer w8: v1(2796.92,2729.11) 2796.92,2930.69 2807.41,2941.18 v1(2807.41,2945.41)
INH_MASK: U3.16 U9.11 | length 3366.3
  Top Layer w8: U3.16@2694.56,2785.18 2694.56,2841.36 2675.19,2860.73 2559.32,2860.73 2540.45,2879.59 2540.45,3043 2556.56,3059.11 3075,3059.11 v1(3135,3119.11) ; U9.11@4089.28,4146.17 v1(4089.28,4217.86)
  Bottom Layer w8: v1(3135,3119.11) 3106.57,3090.68 3000.85,3090.68 2985.59,3105.94 2985.59,3132.44 2993.65,3140.5 2993.65,3674.11 3030.81,3711.28 3430.79,3711.28 3473.65,3754.14 3473.65,4105.63 3601.85,4233.83 4071.29,4233.83 4087.26,4217.86 v1(4089.28,4217.86)
INH_MASK_2: U5.1 U10.11 | length 2300.3
  Top Layer w8: U5.1@2398.08,2776.72 v1(2398.08,3384.11) ; U10.11@3246.21,4146.17 v1(3246.21,4217.86)
  Bottom Layer w8: v1(2398.08,3384.11) 2398.08,4114.34 2475.93,4192.19 3220.54,4192.19 v1(3246.21,4217.86)
INT_EXP: R33.1 U2.42 U3.1 | length 1734.1
  Top Layer w8: v1(2571.32,2565.52) 2591.38,2565.52 U3.1@2592.19,2564.7 R33.1@2592.19,2492.68 ; v1(3833.13,2983.03) 3854.22,2961.95 U2.42@3925.65,2961.95
  Bottom Layer w8: v1(2571.32,2565.52) 3255.66,2565.52 3307.53,2617.39 3646.51,2617.39 3833.13,2804.01 v1(3833.13,2983.03)
INTRN: R190.1 TP7.1 U20.35 | length 235.7
  Top Layer w8: TP7.1@6207.65,1889.5 R190.1@6207.65,1937.71 6286.01,1937.71 6315.93,1907.8 U20.35@6315.93,1841
IO0: J3.5 Q2.3 R78.2 SW9.2 U6.25 | length 1232.8
  Top Layer w10: Q2.3@3774,827.04 3939.66,827.04 ; J3.5@4086.23,531.38 3944.62,531.38 3924.27,551.73 3924.27,811.65 3939.66,827.04 ; v1(4242,947.9) R78.2@4212,947.9 4001.9,947.9 3986,932 3986,827.86 SW9.2@3986.82,827.04 3939.66,827.04 ; U6.25@4349.78,948 v1(4395.9,948)
  Bottom Layer w10: v1(4242,947.9) 4242.05,947.95 4395.85,947.95 v1(4395.9,948)
IO2: R172.2 U6.24 | length 67.8
  Top Layer w8: U6.24@4469.07,997.21 R172.2@4469.07,1065
IO5: R171.2 U6.29 | length 77.8
  Top Layer w7: R171.2@4272,748 U6.29@4349.78,748
IO16: R80.2 U6.27 | length 77.8
  Top Layer w10: R80.2@4272,848 U6.27@4349.78,848
IO17: R79.2 U6.28 | length 77.8
  Top Layer w10: R79.2@4272,798 U6.28@4349.78,798
IO18: R87.2 U6.30 | length 77.8
  Top Layer w8: R87.2@4272,698 U6.30@4349.78,698
IO19: R82.2 U6.31 | length 77.8
  Top Layer w10: R82.2@4272,648 U6.31@4349.78,648
IO21: R81.2 U6.33 | length 77.8
  Top Layer w10: R81.2@4272,548 U6.33@4349.78,548
IO22: R83.2 U6.36 | length 77.8
  Top Layer w10: R83.2@4272,398 U6.36@4349.78,398
IO23: R88.2 U6.37 | length 77.8
  Top Layer w8: R88.2@4272,348 U6.37@4349.78,348
IO25: R84.2 U6.10 | length 77.8
  Top Layer w8: U6.10@5038.76,748 R84.2@5116.54,748
IO26: R85.2 U6.11 | length 77.8
  Top Layer w8: U6.11@5038.76,798 R85.2@5116.54,798
IO27: R86.2 U6.12 | length 77.8
  Top Layer w10: U6.12@5038.76,848 R86.2@5116.54,848
IO32: R90.2 U6.8 | length 77.8
  Top Layer w8: U6.8@5038.76,648 R90.2@5116.54,648
IO33: R170.2 U6.9 | length 77.8
  Top Layer w8: U6.9@5038.76,698 R170.2@5116.54,698
LEDPOL0: R150.1 R167.2 U18.48 | length 2107.3
  Top Layer w10: U18.48@5830.5,3086.24 5830.68,3086.42 5850,3086.42 5857.77,3094.19 5857.77,3156.39 5872.17,3170.79 5948.27,3170.79 6286.48,3509 6286.48,3960.35 6399.63,4073.49 6399.63,4462.74 6476.32,4539.43 R150.1@6476.32,4821.1 R167.2@6427.32,4821.1
LEDPOL1: R160.1 R168.2 U18.46 | length 3293.2
  Top Layer w10: R168.2@5503.32,4821.1 R160.1@5555.32,4821.1 5627.83,4821.1 5745.37,4938.65 6510.84,4938.65 6536,4913.49 6536,4797.11 6499.88,4760.99 6499.88,4529.45 6419.93,4449.5 6419.93,4064.22 6311.69,3955.99 6311.69,3498.56 5968.91,3155.78 5968.91,3112.64 5903.14,3046.87 U18.46@5830.5,3046.87
NetC1_2: C1.2 J1.S1 J1.S2 J1.S3 J1.S4 R3.1 | length 669.7
  Bottom Layer w10: J1.S4@2841.56,211.46 J1.S3@2841.56,46.89 J1.S2@3182.11,46.89 J1.S1@3182.11,211.46
NetC4_2: C4.2 R13.1 X1.1 | length 171.4
  Top Layer w8: C4.2@3230.27,3381.42 3230.27,3312.92 3230.27,3301.11 3256.96,3274.42 R13.1@3310.27,3274.42
NetC6_1: C6.1 R14.1 X1.4 | length 170.2
  Top Layer w8: C6.1@3230.27,3120.42 3230.27,3186.93 3230.27,3198.74 3256.96,3225.43 3308.26,3225.43 R14.1@3310.27,3223.42
NetC7_2: C7.2 R18.1 X2.1 | length 296.1
  Top Layer w8: C7.2@3125.46,2659.34 3149.96,2659.34 3155.15,2654.15 3163.23,2654.15 3184.82,2632.56 3251.96,2632.56 3269.46,2650.06 R18.1@3269.46,2783.84
NetC8_2: C8.2 J7.S1 J7.S2 J7.S3 J7.S4 R17.1 | length 669.7
  Bottom Layer w10: J7.S4@7662.54,2007.5 J7.S3@7827.11,2007.5 J7.S2@7827.11,2348.05 J7.S1@7662.54,2348.05
NetC11_2: C11.2 R19.1 X2.3 | length 145.2
  Top Layer w8: R19.1@3322.46,2783.84 3322.46,2744.7 3344.05,2723.11 X2.3@3344.27,2723.11 3354.11,2723.11 3380.89,2696.34 C11.2@3408.46,2696.34
NetC12_2: C12.2 D6.1 L1.2 U2.7
NetC15_1: C15.1 FB5.1 R32.1 U4.8 | length 145.5
  Top Layer w10: R32.1@7367.1,4339.83 7435.51,4339.83 7457.1,4361.42 U4.8@7457.1,4407.95
NetC17_1: C17.1 L2.1 U7.5
NetC17_2: C17.2 U7.6 | length 36.1
  Top Layer w8: U7.6@740.01,2643.53 C17.2@776.1,2643.53
NetC18_1: C18.1 R42.1 R43.2 U7.1 | length 145
  Top Layer w8: U7.1@732.2,2753.39 737.95,2747.65 R43.2@833.68,2747.65 R42.1@874.8,2747.65
NetC35_1: C35.1 R48.2 R54.1 | length 98.5
  Top Layer w9: R54.1@4290.85,4157.65 4290.85,4106.65 C35.1@4338.31,4106.65
NetC38_1: C38.1 R56.2 R61.1 | length 98.5
  Top Layer w9: R61.1@3447.77,4157.65 3447.77,4106.65 C38.1@3495.23,4106.65
NetC42_1: C42.1 U14.1 | length 83.1
  Top Layer w10: C42.1@1079,1843.11 1079,1793.99 1073,1787.99 U14.1@1068.73,1787.99 1081.47,1787.99 U14.1@1087.47,1793.99
NetC42_2: C42.2 U14.3 | length 191.7
  Top Layer w10: U14.3@1068.73,1687.99 1074.71,1693.97 1103.74,1693.97 1116,1706.24 C42.2@1116,1843.11
NetC44_2: C44.2 U14.2 | length 59.7
  Top Layer w10: C44.2@1009,1737.99 U14.2@1068.73,1737.99
NetC45_2: C45.2 U14.6 | length 59.7
  Top Layer w10: C45.2@1009,1537.99 U14.6@1068.73,1537.99
NetC46_1: C46.1 U14.4 | length 61.4
  Top Layer w10: C46.1@1010,1631.49 1044.45,1631.49 1050.95,1637.99 U14.4@1068.73,1637.99
NetC46_2: C46.2 U14.5 | length 61.4
  Top Layer w10: C46.2@1010,1594.49 1044.45,1594.49 1050.95,1587.99 U14.5@1068.73,1587.99
NetC74_2: C74.2 R183.1 R184.1 | length 333.9
  Top Layer w15: R184.1@5951.56,1228.05 v1(5951.56,1268.96) ; R183.1@6116.6,1228.05 C74.2@6160.11,1228.05 v1(6160.11,1268.96)
  Bottom Layer w15: v1(5951.56,1268.96) v1(6160.11,1268.96)
NetC75_2: C75.2 R185.1 R186.1 | length 333.9
  Top Layer w15: v1(5658.05,1268.96) C75.2@5658.05,1228.05 R186.1@5701.56,1228.05 ; R185.1@5866.6,1228.05 v1(5866.6,1268.96)
  Bottom Layer w15: v1(5658.05,1268.96) v1(5866.6,1268.96)
NetC77_2: C77.2 R187.1 R188.1 R189.1 | length 314.6
  Top Layer w8: C77.2@5370.54,761.92 5361.14,752.52 5361.14,619.82 5372.12,608.84 5400.04,608.84 R189.1@5400.04,562 ; C77.2@5389,742 5409,762 R187.1@5459.04,762
NetC83_2: C83.2 R200.1 R201.1 | length 333.9
  Top Layer w15: R201.1@6906.64,1230.09 v1(6906.64,1271) ; R200.1@7071.68,1230.09 C83.2@7115.19,1230.09 v1(7115.19,1271)
  Bottom Layer w15: v1(6906.64,1271) v1(7115.19,1271)
NetC84_2: C84.2 R202.1 R203.1 | length 333.9
  Top Layer w15: v1(6613.13,1271) C84.2@6613.13,1230.09 R203.1@6656.64,1230.09 ; R202.1@6821.68,1230.09 v1(6821.68,1271)
  Bottom Layer w15: v1(6613.13,1271) v1(6821.68,1271)
NetC87_2: C87.2 J34.4 J34.5 R149.1 | length 347.4
  Top Layer w10: J34.4@6096.34,4338.19 6135.32,4299.21 R149.1@6135.32,4167.65 C87.2@6135.32,4127.65
  Bottom Layer w10: J34.5@6046.34,4438.19 6051.05,4433.48 6051.05,4383.48 J34.4@6096.34,4338.19
NetC88_2: C88.2 FB9.2 U18.58 | length 245.3
  Top Layer w10: FB9.2@5610.37,3346.83 5616.16,3341.04 5616.16,3306.73 C88.2@5619.43,3303.46 5615.66,3299.68 5615.66,3213.48 5627.75,3201.39 U18.58@5627.75,3111.83
NetC89_2: C89.2 U18.1 X3.1 | length 375.8
  Top Layer w8: X3.1@5241.28,3238.84 5256.24,3253.8 C89.2@5256.24,3306.22
  Top Layer w10: X3.1@5259.9,3220.21 5259.9,3207.74 5271.67,3195.97 5390.47,3195.97 5474.06,3112.37 5474.06,3086.24 U18.1@5484.05,3086.24
NetC90_2: C90.2 U18.2 X3.3 | length 313.4
  Top Layer w10: C90.2@5293.24,3091.63 5293.24,3137.26 X3.3@5308.21,3152.22 5308.21,3155.85 5326.83,3174.47 5379.12,3174.47 5449.93,3103.67 5449.93,3078.53 5461.9,3066.55 U18.2@5484.05,3066.55
NetC95_2: C95.2 J35.4 J35.5 R155.1 | length 347.4
  Top Layer w10: J35.4@5173.52,4338.19 5212.49,4299.21 R155.1@5212.49,4167.65 C95.2@5212.49,4127.65
  Bottom Layer w10: J35.5@5123.52,4438.19 5128.22,4433.48 5128.22,4383.48 J35.4@5173.52,4338.19
NetC98_2: C98.2 R204.1 R205.1 R206.1 | length 315.1
  Top Layer w8: C98.2@6322.5,762 6313.1,752.6 6313.1,619.9 6324.08,608.92 R205.1@6352,608.92 R206.1@6352,562.08 ; C98.2@6340.5,742 6360.5,762 R204.1@6411,762
NetD17_2: D17.2 J14.3 J14.4 J14.5 J14.6
NetD19_2: D19.2 J14.1 J14.2 J14.7 J14.8 J15.1
NetD24_1: D24.1 F2.1 R112.2 | length 255.2
  Top Layer w8: R112.2@1144.72,4234.85 1142.97,4234.85 1141.66,4236.17 1141.66,4300.91 1128.75,4313.82 1128.75,4324.99 D24.1@1116.72,4337.02 1091.95,4337.02 1086.63,4342.33 1086.63,4364.85 1127.37,4405.58 F2.1@1155.32,4405.58
NetD24_2: D24.2 F1.1 R110.2 | length 298.2
  Top Layer w8: F1.1@1003.32,4405.58 1031.27,4405.58 1072.01,4364.85 1072.01,4342.33 1066.69,4337.02 D24.2@1041.92,4337.02 1041.92,4335.05 1070.15,4306.81 1106.79,4306.81 1119.55,4294.05 1119.55,4236.17 1118.24,4234.85 R110.2@1116.72,4234.85
NetD25_2: D25.2 F4.2 R117.1 | length 375.7
  Top Layer w10: F4.2@704.06,1528.11 810,1528.11 D25.2@827,1545.11 887.13,1545.11 903.55,1528.69 903.55,1460.37 925.93,1437.99 R117.1@988.35,1437.99
NetD26_2: D26.2 F3.2 R113.1 | length 423.7
  Top Layer w10: F3.2@704.06,1688.11 721.06,1671.11 D26.2@827,1671.11 827,1663.69 869.25,1621.45 898.47,1621.45 922.57,1597.35 922.57,1508.31 942.89,1487.99 R113.1@988.35,1487.99
NetD27_2: D27.2 F6.2 R121.1 | length 1778.3
  Top Layer w10: F6.2@506.43,964.02 625.9,964.02 D27.2@645.9,944.02 v1(645.9,1019.11) ; v1(755,1019.11) 755,1062.03 782.1,1089.12 1437.98,1089.12 1494.76,1145.91 1494.76,1624.13 1446.34,1672.55 1387.1,1672.55 1373.94,1685.71 1371.97,1685.71 1371.65,1686.02 R121.1@1371.65,1687.99
  Bottom Layer w10: v1(645.9,1019.11) v1(755,1019.11)
NetD28_2: D28.2 F5.2 R120.1 | length 1878.4
  Top Layer w10: F5.2@506.43,724.11 625.9,724.11 D28.2@645.9,744.11 653.77,744.11 725,815.34 725,1062.38 771.73,1109.11 1429.7,1109.11 1474.78,1154.19 1474.78,1615.85 1438.06,1652.56 1386.22,1652.56 1373.94,1640.28 1371.97,1640.28 1371.65,1639.96 R120.1@1371.65,1637.99
NetD29_1: D29.1 F9.1 R136.2 | length 255.2
  Top Layer w8: R136.2@1908.72,4234.85 1906.97,4234.85 1905.66,4236.17 1905.66,4300.91 1892.75,4313.82 1892.75,4324.99 D29.1@1880.72,4337.02 1855.95,4337.02 1850.63,4342.33 1850.63,4364.85 1891.37,4405.58 F9.1@1919.32,4405.58
NetD29_2: D29.2 F7.1 R134.2 | length 298.2
  Top Layer w8: F7.1@1767.32,4405.58 1795.27,4405.58 1836.01,4364.85 1836.01,4342.33 1830.69,4337.02 D29.2@1805.92,4337.02 1805.92,4335.05 1834.15,4306.81 1870.79,4306.81 1883.55,4294.05 1883.55,4236.17 1882.24,4234.85 R134.2@1880.72,4234.85
NetD30_1: D30.1 F10.1 R137.2 | length 255.2
  Top Layer w8: R137.2@2672.72,4234.85 2670.97,4234.85 2669.66,4236.17 2669.66,4300.91 2656.75,4313.82 2656.75,4324.99 D30.1@2644.72,4337.02 2619.95,4337.02 2614.63,4342.33 2614.63,4364.85 2655.37,4405.58 F10.1@2683.32,4405.58
NetD30_2: D30.2 F8.1 R135.2 | length 298.2
  Top Layer w8: F8.1@2531.32,4405.58 2559.27,4405.58 2600.01,4364.85 2600.01,4342.33 2594.69,4337.02 D30.2@2569.92,4337.02 2569.92,4335.05 2598.15,4306.81 2634.79,4306.81 2647.55,4294.05 2647.55,4236.17 2646.24,4234.85 R135.2@2644.72,4234.85
NetFB1_1: FB1.1 J1.A4/B9 J1.B4/A9
  other v1: 3011.94,144.84 2917.35,288.15 3106.33,288.15
NetFB1_2: FB1.2 R9.1
NetFB2_1: FB2.1 J7.A4/B9 J7.B4/A9
  other v1: 7585.85,2083.28 7729.16,2177.87 7585.85,2272.26
NetFB2_2: FB2.2 R12.1
NetJ1_A5: J1.A5 R1.1 | length 221.3
  Top Layer w10: R1.1@2892.77,401.89 2892.77,327.74 2906.37,314.15 2948.05,314.15 2962.63,299.57 J1.A5@2962.63,233.9
NetJ1_B5: J1.B5 R2.1 | length 168
  Top Layer w10: J1.B5@3080.74,233.9 R2.1@3080.74,401.89
NetJ7_A5: J7.A5 R15.1 | length 215.2
  Top Layer w8: R15.1@7472.11,2061.64 7541.48,2061.64 7559.98,2080.13 7559.98,2113.44 7575.09,2128.56 J7.A5@7640.1,2128.56
NetJ7_B5: J7.B5 R16.1 | length 168
  Top Layer w10: R16.1@7472.11,2246.67 J7.B5@7640.1,2246.67
NetJ8_4: J8.4 R178.1 | length 630.2
  Top Layer w8: R178.1@5509.04,665.16 v1(5547.15,665.16)
  Bottom Layer w8: v1(5547.15,665.16) 5573.49,638.82 5573.49,476.21 5593.74,455.96 5859.84,455.96 J8.4@5928.76,387.04
NetJ8_5: J8.5 R179.1 | length 688.9
  Top Layer w8: R179.1@5509.04,611 v1(5547.15,611)
  Bottom Layer w8: v1(5547.15,611) 5547.15,470 5580.19,436.96 5690.33,436.96 5718.21,409.09 5718.21,295.67 5742.92,270.96 5843,270.96 J8.5@5889,316.96
NetJ8_7: J8.7 R180.1 | length 380.2
  Top Layer w8: R180.1@5505.92,503.04 5564.29,503.04 5750.37,316.96 J8.7@5809.08,316.96
NetJ8_8: J8.8 R182.1 | length 333.4
  Top Layer w8: R182.1@5505.92,557.12 5544.03,557.12 5714.11,387.04 J8.8@5768.92,387.04
NetJ8_10: J8.10 R177.1 | length 168.9
  Top Layer w8: R177.1@5648.21,674.96 5711.66,674.96 5729.16,657.46 J8.10@5729.16,576.8
NetJ8_12: J8.12 R181.1 | length 101.8
  Top Layer w8: R181.1@6170.37,674.96 6179.16,666.17 J8.12@6179.16,576.8
NetJ9_1: J9.1 R23.2 | length 308.1
  Top Layer w9: R23.2@7562.18,1883 7594.86,1883 7739.93,1737.93 7795.93,1737.93 J9.1@7806,1727.85
NetJ9_2: J9.2 R24.2 | length 294.6
  Top Layer w9: R24.2@7562.18,1750.43 7674.35,1750.43 7796.93,1627.85 J9.2@7806,1627.85
NetJ9_3: J9.3 R26.2 | length 281.1
  Top Layer w9: R26.2@7562.18,1617.85 7716,1617.85 J9.3@7806,1527.85
NetJ9_4: J9.4 R27.2 | length 267.6
  Top Layer w9: R27.2@7562.18,1485.28 7748.57,1485.28 J9.4@7806,1427.85
NetJ9_5: J9.5 R28.2 | length 254.1
  Top Layer w9: R28.2@7562.18,1352.71 7769.79,1352.71 7794.65,1327.85 J9.5@7806,1327.85
NetJ9_6: J9.6 R29.2 | length 247
  Top Layer w9: R29.2@7562.18,1220.14 7566.04,1224 7802.14,1224 J9.6@7806,1227.85
NetJ9_7: J9.7 R30.2 | length 260.5
  Top Layer w9: R30.2@7562.18,1087.57 7765.72,1087.57 J9.7@7806,1127.85
NetJ9_8: J9.8 R31.2 | length 274
  Top Layer w9: R31.2@7562.18,955 7733.14,955 J9.8@7806,1027.85
NetJ10_1: J10.1 R25.1 | length 100
  Top Layer w7: R25.1@4169.27,3385.42 J10.1@4269.27,3385.42
NetJ12_2: J12.2 R37.2 | length 483.1
  Top Layer w10: R37.2@7398.04,4101.4 7529.79,4101.4 7562.19,4069 7653.5,4069 J12.2@7805,4220.5
NetJ12_3: J12.3 R38.2 | length 352
  Top Layer w10: R38.2@7577.04,4101.4 7642.8,4101.4 7749.91,4208.52 7749.91,4265.41 J12.3@7805,4320.5
NetJ16_4: J16.4 R194.1 | length 630.3
  Top Layer w8: R194.1@6461,666 v1(6499.11,666)
  Bottom Layer w8: v1(6499.11,666) 6525.21,639.9 6525.21,481.61 6548.82,458 6814.92,458 J16.4@6883.84,389.08
NetJ16_5: J16.5 R196.1 | length 689
  Top Layer w8: R196.1@6461,611.84 v1(6499.11,611.84)
  Bottom Layer w8: v1(6499.11,611.84) 6499.11,475.16 6535.27,439 6645.41,439 6673.29,411.13 6673.29,297.71 6698,273 6798.08,273 J16.5@6844.08,319
NetJ16_7: J16.7 R197.1 | length 380.2
  Top Layer w8: R197.1@6461,505.08 6519.37,505.08 6705.45,319 J16.7@6764.16,319
NetJ16_8: J16.8 R199.1 | length 333.4
  Top Layer w8: R199.1@6461,559.16 6499.11,559.16 6669.19,389.08 J16.8@6724,389.08
NetJ16_10: J16.10 R192.1 | length 166.9
  Top Layer w8: R192.1@6603.16,677 6663.2,677 6684.24,655.96 J16.10@6684.24,578.84
NetJ16_12: J16.12 R198.1 | length 101.9
  Top Layer w8: R198.1@7125.16,677 7134.24,667.92 J16.12@7134.24,578.84
NetJ17_2: J17.2 R48.1 | length 678.5
  Top Layer w9: v1(4209.85,4106.65) R48.1@4229.85,4106.65
  Bottom Layer w9: J17.2@3894.32,4285.65 3947.61,4338.94 4248.08,4338.94 4264.37,4322.65 4264.37,4123.65 4247.37,4106.65 v1@4210.77,4106.65
NetJ18_7: J18.7 R52.2 | length 452.9
  Top Layer w10: J18.7@4235.71,4821.64 4311.07,4821.64 4329.09,4803.63 4329.09,4725.41 4275.87,4672.19 R52.2@4275.87,4473.65
NetJ18_8: J18.8 R53.2 | length 294.6
  Top Layer w10: R53.2@4235.71,4473.65 4235.71,4711.41 J18.8@4275.87,4751.57
NetJ19_1: J19.1 R54.2 | length 136.3
  Top Layer w8: J19.1@4209.86,4285.65 4229.85,4265.66 R54.2@4229.85,4157.65
NetJ20_2: J20.2 R56.1 | length 678.5
  Top Layer w9: v1@3366.77,4106.65 R56.1@3386.77,4106.65
  Bottom Layer w9: J20.2@3051.32,4285.65 3104.61,4338.94 3405.08,4338.94 3421.37,4322.65 3421.37,4123.65 3404.37,4106.65 v1@3367.77,4106.65
  other v1: 3366.32,4106.65
NetJ22_7: J22.7 R60.2 | length 452.9
  Top Layer w10: J22.7@3392.71,4821.64 3468.07,4821.64 3486.09,4803.63 3486.09,4725.41 3432.87,4672.19 R60.2@3432.87,4473.65
NetJ22_8: J22.8 R62.2 | length 294.6
  Top Layer w10: R62.2@3392.71,4473.65 3392.71,4711.41 J22.8@3432.87,4751.57
NetJ23_1: J23.1 R61.2 | length 136.3
  Top Layer w8: J23.1@3366.32,4285.65 3386.32,4265.65 R61.2@3386.32,4157.65
NetJ24_4: J24.4 R65.2 | length 175.5
  Top Layer w10: R65.2@1872.47,1540.43 1872.47,1543.93 1876.47,1547.93 1888.97,1547.93 1901.79,1560.74 J24.4@2037.47,1560.74